# Altium PCB BLDC-Board.PcbDoc (part 5 of 7)
Units mm, origin at the board's own origin, x right, y up, seen from the top; angles counter-clockwise.
Board outline 150 x 117 mm, 4 copper layers (Top Layer, Layer 1, Layer 2, Bottom Layer), stack 1.566 mm thick; 307 components, 221 nets, 983 pads, 534 vias.
Unrouted connection lines stored in the file: 337.
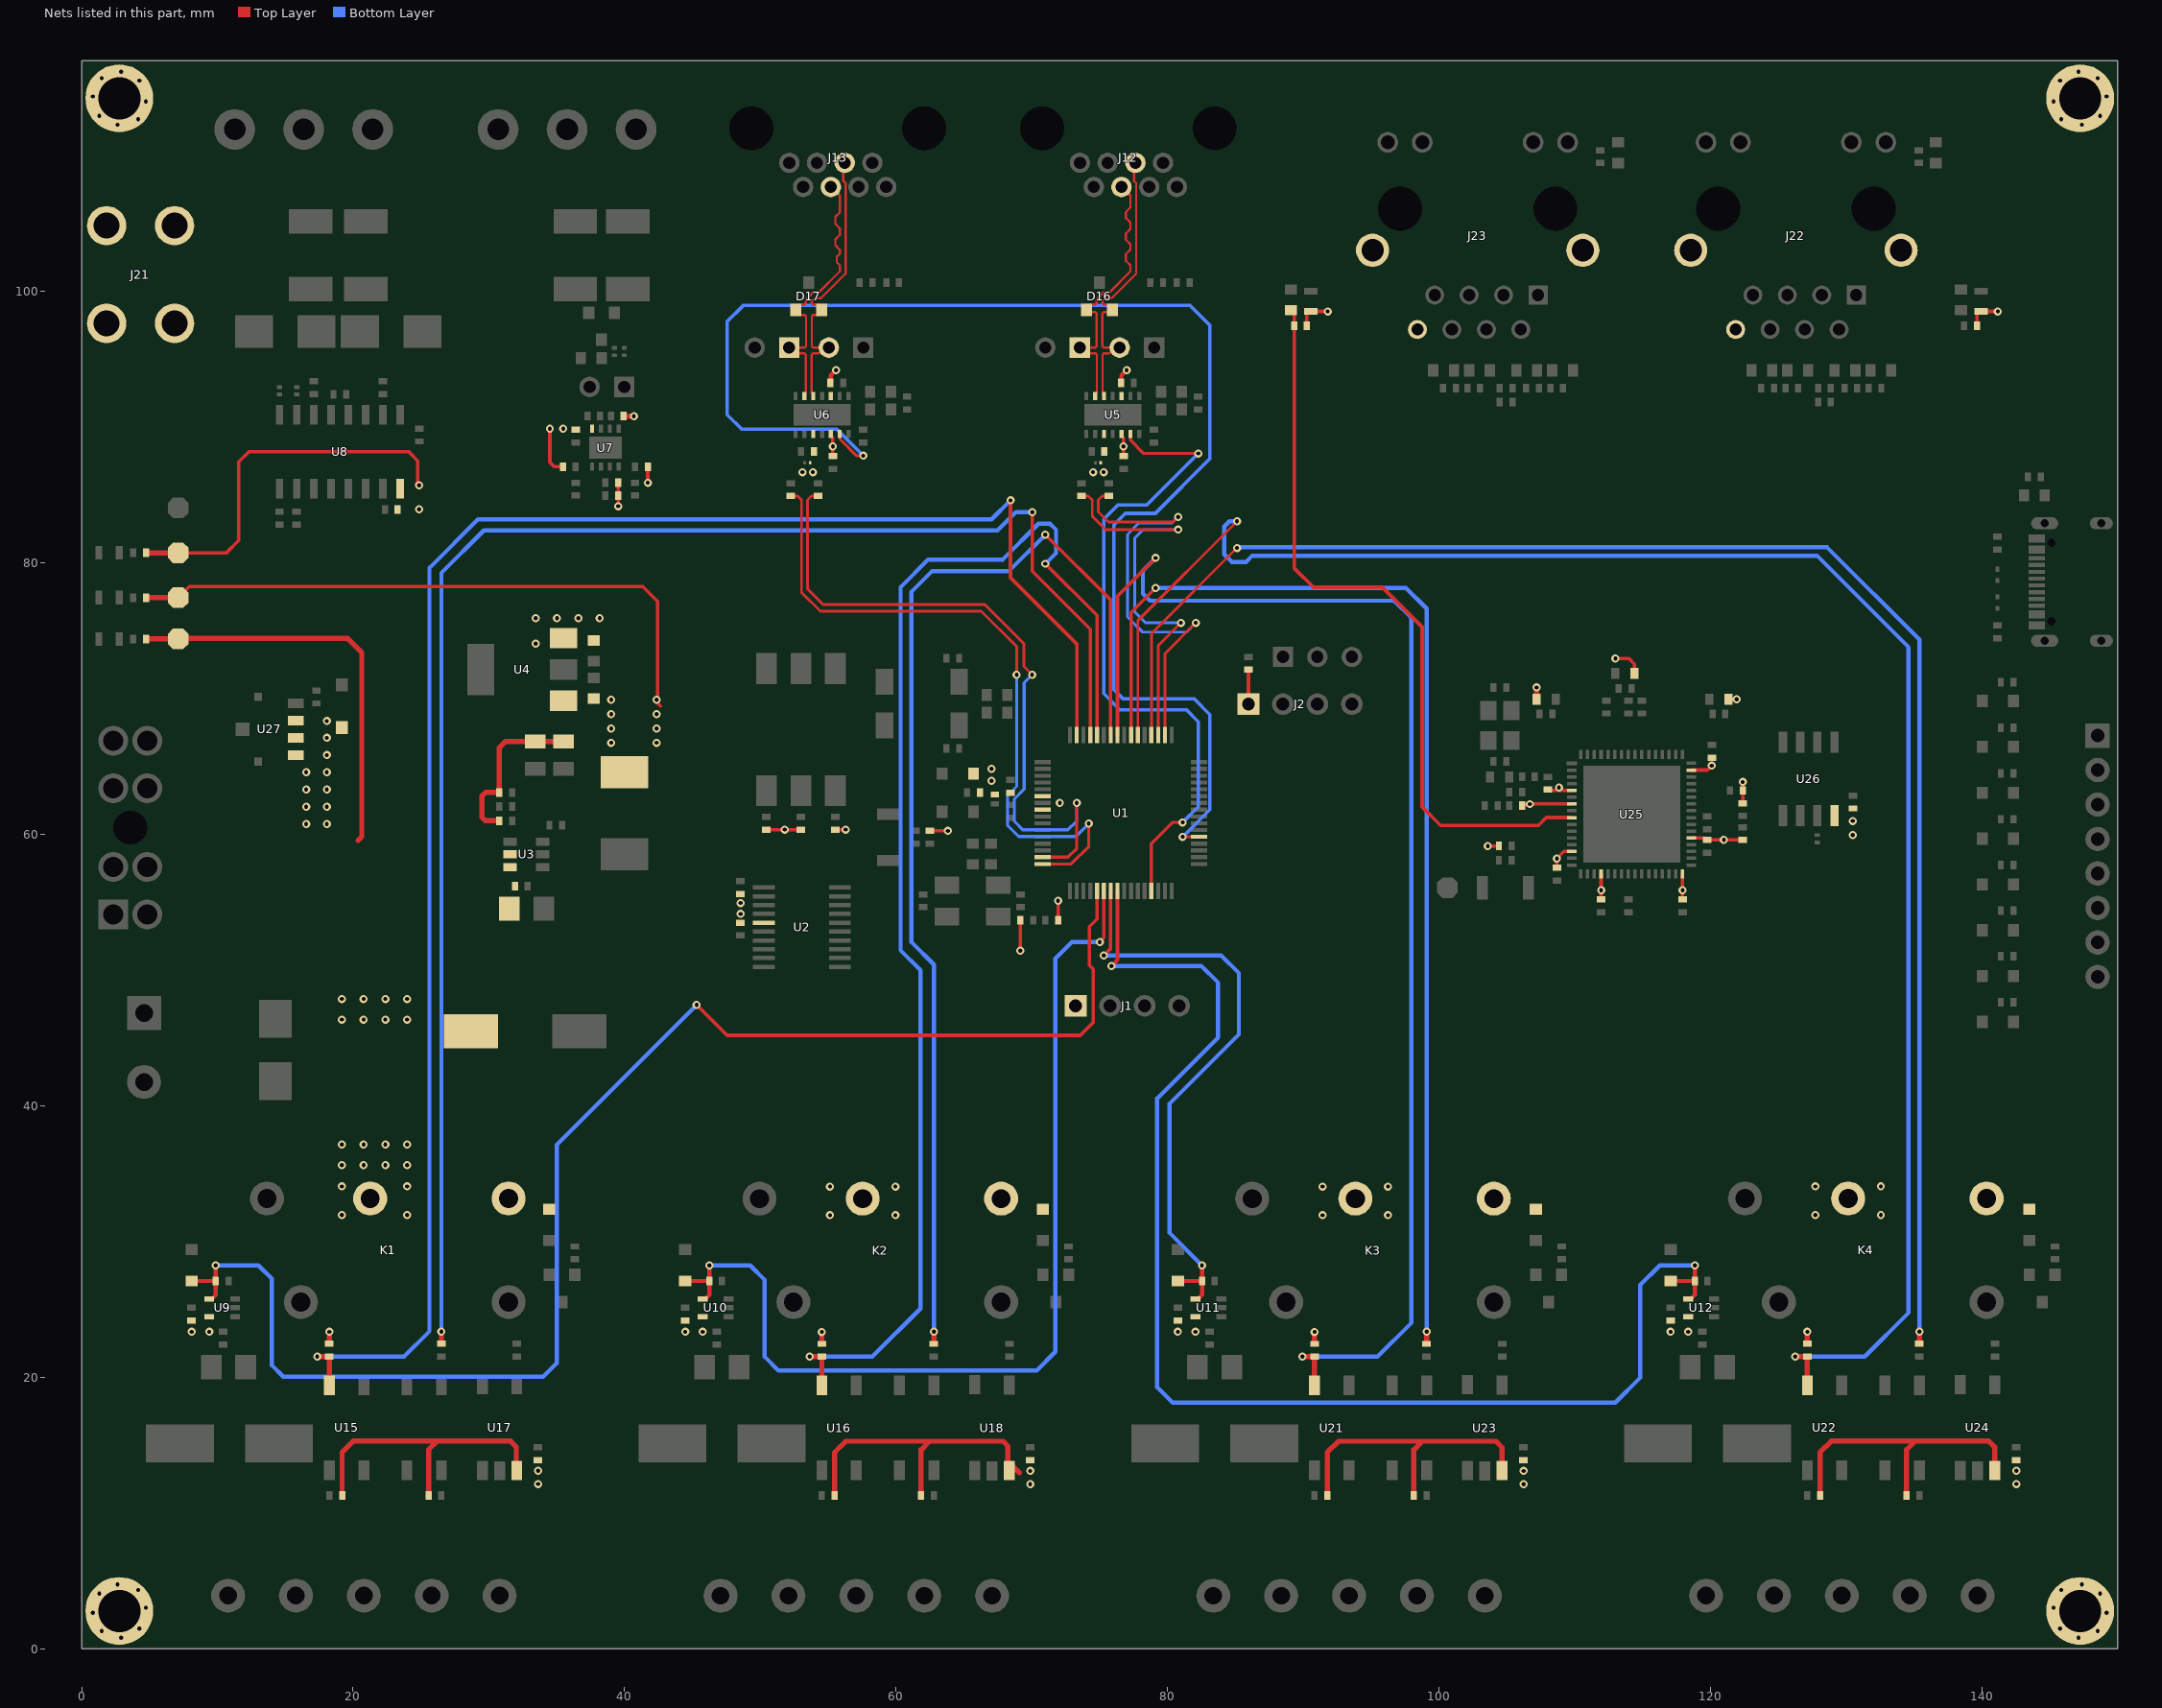
[diagram p4: the nets of this part, all layers, seen from the top]

## Via types
v1: diameter 0.6, hole 0.3, Top Layer to Bottom Layer, 534 vias

## Nets (pads, with @x,y where several pads share a name; then routed paths per layer and width w, separated by ;. In a path a pad name is that pad's centre, name@x,y a point inside that pad or via, vN(x,y) a via of type N, cw(c..) or ccw(c..) an arc to the next point about the centre after c; other vN are vias at no path point) (continued)
+24V: (continued)
  other v1: 19.177,31.947 23.978,31.947 55.127,31.939 59.943,31.939 91.423,31.939 96.24,31.939 127.724,31.947 132.54,31.947 19.177,34.059 23.978,34.059 55.127,34.051 59.943,34.051 91.423,34.051 96.24,34.051 127.724,34.059 132.54,34.059 19.177,35.63 20.777,35.63 22.377,35.63 23.978,35.63 19.177,37.154 20.777,37.154 22.377,37.154 23.978,37.154 19.177,46.348 20.777,46.348 22.377,46.348 23.978,46.348 19.177,47.872 20.777,47.872 22.377,47.872 23.978,47.872 16.543,60.757 18.059,60.757 16.543,62.027 18.059,62.027 16.543,63.297 18.059,63.297 16.543,64.567 18.059,64.567 18.059,65.837 18.059,67.107 18.059,68.344
ADC_CURRENT1: D21.1 R68.2 U1.21 U9.4 | length 108.5
  Top Layer w0.254: v1(45.304,47.435) 47.551,45.189 73.568,45.189 74.525,46.146 74.525,50.067 74.245,50.347 74.245,53.194 74.806,53.755 U1.21@74.806,55.813
  Top Layer w0.305: D21.1@8.106,27.095 R68.2@9.883,27.095 ; U9.4@9.403,25.766 9.577,25.766 9.883,26.072 R68.2@9.883,27.095 ; v1(9.883,28.245) R68.2@9.883,27.095
  Bottom Layer w0.305: v1(9.883,28.245) 13.023,28.245 14.021,27.248 14.021,20.872 14.859,20.034 33.998,20.034 35.001,21.037 35.001,37.132 v1(45.304,47.435)
ADC_CURRENT2: D22.1 R69.2 U1.22 U10.4 | length 73.8
  Top Layer w0.254: v1(75.006,52.065) 75.006,52.088 75.306,52.387 U1.22@75.306,55.813
  Top Layer w0.305: D22.1@44.462,27.095 R69.2@46.239,27.095 ; U10.4@45.759,25.766 45.933,25.766 46.239,26.072 R69.2@46.239,27.095 ; v1(46.239,28.245) R69.2@46.239,27.095
  Bottom Layer w0.305: v1(46.239,28.245) 49.244,28.245 50.317,27.171 50.317,21.507 51.333,20.491 70.346,20.491 71.73,21.875 71.73,50.844 72.951,52.065 v1(75.006,52.065)
ADC_CURRENT3: D23.1 R70.2 U1.23 U11.4 | length 44.6
  Top Layer w0.254: v1(75.298,51.072) 75.806,51.58 U1.23@75.806,55.813
  Top Layer w0.305: D23.1@80.759,27.095 R70.2@82.536,27.095 ; U11.4@82.056,25.766 82.23,25.766 82.536,26.072 R70.2@82.536,27.095 ; v1(82.536,28.245) R70.2@82.536,27.095
  Bottom Layer w0.305: v1(75.298,51.072) 83.947,51.072 85.242,49.777 85.242,45.256 80.149,40.163 80.149,30.632 v1(82.536,28.245)
ADC_CURRENT4: D24.1 R71.2 U1.24 U12.4 | length 98.5
  Top Layer w0.254: v1(75.872,50.301) 76.306,50.735 U1.24@76.306,55.813
  Top Layer w0.305: D24.1@117.059,27.095 R71.2@118.836,27.095 ; U12.4@118.356,25.766 118.53,25.766 118.836,26.072 R71.2@118.836,27.095 ; v1(118.836,28.245) R71.2@118.836,27.095
  Bottom Layer w0.305: v1(75.872,50.301) 82.483,50.301 83.718,49.066 83.718,45.028 79.222,40.531 79.222,19.272 80.365,18.129 112.98,18.129 114.808,19.958 114.808,26.79 116.263,28.245 v1(118.836,28.245)
CAN1_N: D16.2 J9.2 J12.5 U5.12 | length 21.5
  Top Layer w0.165: U5.12@75.308,92.297 75.241,92.364 75.241,92.58 75.21,92.611 75.21,95.337 75.307,95.434 75.71,95.434 J9.2@76.129,95.853 ; J9.2@76.468,95.853 J9.2@76.129,95.853 ; J12.5@77.624,109.467 77.529,109.372 77.529,108.127 77.685,107.972 77.685,101.297 75.877,99.489 75.44,99.489 75.19,99.239 75.19,99.102 75.287,99.006 75.603,99.006 75.931,98.678 D16.2@75.931,98.628 75.764,98.461 75.287,98.461 75.19,98.364 75.19,95.95 75.287,95.853 J9.2@76.129,95.853
CAN1_P: D16.1 J8.1 J12.4 U5.13 | length 21.1
  Top Layer w0.165: U5.13@74.658,92.297 74.658,92.447 74.791,92.58 74.791,95.337 74.694,95.434 73.952,95.434 J8.1@73.533,95.853 74.675,95.853 74.771,95.95 74.771,98.364 74.675,98.461 74.198,98.461 D16.1@74.031,98.628 74.031,98.678 74.358,99.006 74.675,99.006 74.771,99.102 74.771,99.413 75.266,99.908 75.703,99.908 77.266,101.47 ; J12.4@76.604,107.687 76.653,107.687 77.266,107.075 77.266,106.171 76.93,105.835 76.93,105.406 77.266,105.071 77.266,104.593 76.93,104.257 76.93,103.812 77.266,103.476 77.266,103.084 76.93,102.748 76.93,102.254 77.266,101.918 77.266,101.478
CAN1_RX: R33.2 U1.50 | length 33.5
  Top Layer w0.203: R33.2@75.679,84.918 75.181,84.918 74.892,84.629 74.892,83.74 75.63,83.002 80.393,83.002 v1(80.772,83.382) ; U1.50@79.806,67.313 79.806,73.309 v1(82.074,75.578)
  Bottom Layer w0.203: v1(80.772,83.382) 80.324,82.933 77.882,82.933 77.045,82.096 77.045,76.008 78.161,74.893 81.389,74.893 v1(82.074,75.578)
CAN1_TX: R34.2 U1.51 | length 30.4
  Top Layer w0.203: R34.2@73.661,84.918 74.158,84.918 74.447,84.629 74.447,83.432 75.438,82.442 v1(80.772,82.442) ; U1.51@79.306,67.313 79.306,73.904 v1(80.979,75.578)
  Bottom Layer w0.203: v1(80.772,82.442) 78.2,82.442 77.578,81.819 77.578,76.377 78.377,75.578 v1(80.979,75.578)
CAN2_N: D17.2 J11.2 J13.5 U6.12 | length 21.4
  Top Layer w0.165: U6.12@53.894,92.297 53.894,92.447 53.774,92.567 53.774,95.337 53.871,95.434 54.284,95.434 J11.2@54.703,95.853 ; J11.2@55.042,95.853 J11.2@54.703,95.853 ; J13.5@56.212,109.467 56.117,109.372 56.117,108.127 56.273,107.972 56.273,101.304 54.457,99.489 54.028,99.489 53.778,99.239 53.778,99.102 53.875,99.006 54.191,99.006 54.519,98.678 54.519,98.578 54.191,98.251 53.888,98.251 53.791,98.154 53.791,95.95 53.888,95.853 J11.2@54.703,95.853
CAN2_P: D17.1 J10.1 J13.4 U6.13 | length 20.9
  Top Layer w0.165: U6.13@53.244,92.297 53.244,92.447 53.355,92.558 53.355,95.337 53.258,95.434 52.54,95.434 J10.1@52.121,95.853 53.275,95.853 53.372,95.95 53.372,98.154 53.275,98.251 52.946,98.251 52.619,98.578 D17.1@52.619,98.628 52.619,98.678 52.946,99.006 53.262,99.006 53.359,99.102 53.359,99.413 53.854,99.908 54.284,99.908 55.854,101.478 55.854,101.918 55.627,102.145 55.627,102.555 55.854,102.782 55.854,103.055 55.518,103.39 55.518,103.822 55.854,104.158 55.854,104.635 55.518,104.97 55.518,105.477 55.854,105.812 55.854,107.075 55.241,107.687 J13.4@55.192,107.687
CAN2_RX: R35.2 U1.15 | length 51.5
  Top Layer w0.203: R35.2@54.265,84.918 53.767,84.918 53.478,84.629 53.478,78.073 54.621,76.93 66.535,76.93 69.413,74.052 69.413,72.361 v1(70.017,71.757)
  Top Layer w0.229: U1.15@70.806,58.313 72.656,58.313 73.306,58.963 v1(73.306,62.313)
  Bottom Layer w0.229: v1(70.017,71.757) 69.427,71.166 69.427,63.326 68.708,62.606 68.708,60.963 69.333,60.338 72.661,60.338 73.306,60.982 v1(73.306,62.313)
CAN2_TX: R36.2 U1.16 | length 51
  Top Layer w0.203: R36.2@52.246,84.918 52.744,84.918 53.033,84.629 53.033,77.821 54.417,76.437 66.275,76.437 68.883,73.83 v1(68.883,71.757)
  Top Layer w0.229: U1.16@70.806,57.813 72.91,57.813 74.193,59.097 v1(74.193,60.789)
  Bottom Layer w0.229: v1(68.883,71.757) 68.883,63.529 68.214,62.861 68.214,60.655 69.023,59.846 73.25,59.846 v1(74.193,60.789)
"CHASIS GND": "J22.Shield 1" "J22.Shield 2" "J23.Shield 1" "J23.Shield 2" J21.1 J22.8 J23.8 pad.MH1
  other v1: 2.904,0.82 147.096,0.82 1.484,1.303 148.516,1.303 4.25,1.482 145.75,1.482 0.821,2.648 149.179,2.648 4.732,3.014 145.268,3.014 1.304,4.069 148.696,4.069 4.172,4.324 145.828,4.324 2.65,4.731 147.35,4.731 2.65,112.269 147.35,112.269 4.172,112.676 145.828,112.676 1.304,112.931 148.696,112.931 4.732,113.986 145.268,113.986 0.821,114.352 149.179,114.352 4.25,115.518 145.75,115.518 1.484,115.697 148.516,115.697 2.904,116.18 147.096,116.18
DIR1_IN: R76.1 U1.61 | length 120.4
  Top Layer w0.254: v1(70.028,83.74) 70.028,79.383 74.306,75.105 U1.61@74.306,67.313
  Top Layer w0.381: R76.1@26.504,22.468 v1(26.504,23.363)
  Bottom Layer w0.305: v1(26.504,23.363) 26.504,79.262 29.633,82.391 67.476,82.391 68.825,83.74 v1(70.028,83.74)
DIR2_IN: R77.1 U1.58 | length 84.4
  Top Layer w0.254: v1(70.995,82.065) 75.806,77.255 U1.58@75.806,67.313
  Top Layer w0.381: R77.1@62.784,22.46 v1(62.784,23.355)
  Bottom Layer w0.305: v1(62.784,23.355) 62.784,50.396 61.135,52.044 61.135,77.874 62.654,79.392 68.322,79.392 v1(70.995,82.065)
DIR3_IN: R86.1 U1.55 | length 86.3
  Top Layer w0.254: U1.55@77.306,67.313 77.306,76.334 v1(79.121,78.149)
  Top Layer w0.381: R86.1@99.08,22.46 v1(99.08,23.355)
  Bottom Layer w0.305: v1(79.121,78.149) 97.555,78.149 99.08,76.624 v1(99.08,23.355)
DIR4_IN: R87.1 U1.52 | length 121.4
  Top Layer w0.203: U1.52@78.806,67.313 78.806,74.786 v1(85.115,81.096)
  Top Layer w0.381: R87.1@135.381,22.468 v1(135.381,23.363)
  Bottom Layer w0.305: v1(85.115,81.096) 85.16,81.14 128.584,81.14 135.381,74.343 v1(135.381,23.363)
EN_CAN: U1.29 U5.6 | length 49.9
  Top Layer w0.229: U5.6@77.258,89.497 77.267,89.489 77.267,89.028 78.239,88.055 v1(82.271,88.055) ; U1.29@78.806,55.813 78.806,59.313 80.369,60.876 v1(81.109,60.876)
  Bottom Layer w0.254: v1(81.109,60.876) 82.271,62.037 82.271,68.286 81.374,69.182 76.472,69.182 75.29,70.364 75.29,83.212 76.352,84.274 78.489,84.274 v1(82.271,88.055)
EN_CAN_2: U1.37 U6.6 | length 107.3
  Top Layer w0.229: U6.6@55.844,89.497 55.88,89.461 55.88,89.086 57.076,87.89 v1(57.582,87.89) ; v1(81.109,59.813) U1.37@82.306,59.813
  Bottom Layer w0.254: v1(57.582,87.89) 55.638,89.834 48.642,89.834 47.563,90.913 47.563,97.781 48.734,98.952 81.667,98.952 83.099,97.52 83.099,87.644 79.097,83.642 76.888,83.642 76.035,82.789 76.035,70.662 76.702,69.995 81.933,69.995 83.121,68.807 83.121,61.825 v1(81.109,59.813)
ERRLED: R120.1 R121.2 U25.9 | length 55.4
  Top Layer w0.254: R121.2@89.078,98.61 89.319,98.368 R120.1@89.319,97.453 89.319,79.618 90.74,78.198 95.822,78.198 98.753,75.266 98.753,62.012 100.11,60.655 107.317,60.655 107.892,61.231 U25.9@109.785,61.231
FB_1: R78.1 U1.63 U15.4 | length 132.5
  Top Layer w0.254: v1(68.428,84.601) 68.428,78.911 73.306,74.033 U1.63@73.306,67.313
  Top Layer w0.381: v1(17.355,21.528) R78.1@18.25,21.528 U15.4@18.25,19.408
  Bottom Layer w0.305: v1(17.355,21.528) 23.757,21.528 25.618,23.389 25.618,79.624 29.201,83.207 67.034,83.207 v1(68.428,84.601)
FB_2: R79.1 U1.60 U16.4 | length 97
  Top Layer w0.254: v1(70.995,79.931) 74.806,76.121 U1.60@74.806,67.313
  Top Layer w0.381: v1(53.635,21.52) R79.1@54.53,21.52 U16.4@54.53,19.4
  Bottom Layer w0.305: v1(53.635,21.52) 58.255,21.52 61.793,25.058 61.793,49.985 60.326,51.453 60.326,78.207 62.359,80.241 67.856,80.241 70.492,82.878 71.332,82.878 71.777,82.433 71.777,80.713 v1(70.995,79.931)
FB_3: R88.1 U1.57 U21.4 | length 101.8
  Top Layer w0.254: U1.57@76.306,67.313 76.306,77.544 v1(79.121,80.359)
  Top Layer w0.381: v1(89.932,21.52) R88.1@90.827,21.52 U21.4@90.827,19.4
  Bottom Layer w0.305: v1(79.121,80.359) 78.178,79.416 78.178,77.725 78.694,77.209 96.687,77.209 97.963,75.934 97.963,24.013 95.469,21.52 v1(89.932,21.52)
FB_4: R89.1 U1.54 U22.4 | length 137.3
  Top Layer w0.203: U1.54@77.806,67.313 77.806,75.743 v1(85.115,83.053)
  Top Layer w0.381: v1(126.232,21.528) R89.1@127.127,21.528 U22.4@127.127,19.408
  Bottom Layer w0.305: v1(85.115,83.053) 84.561,83.053 84.175,82.667 84.175,80.627 84.745,80.057 85.778,80.057 86.244,80.522 127.836,80.522 134.584,73.774 134.584,24.76 131.352,21.528 v1(126.232,21.528)